# Altium PCB nrf52mini.PcbDoc
Units mm, origin at the board's own origin, x right, y up, seen from the top; angles counter-clockwise.
Board outline 69 x 66.5 mm, 2 copper layers (Top Layer, Bottom Layer), stack 0.97 mm thick; 12 components, 18 nets, 82 pads, 0 vias.
Unrouted connection lines stored in the file: 48.
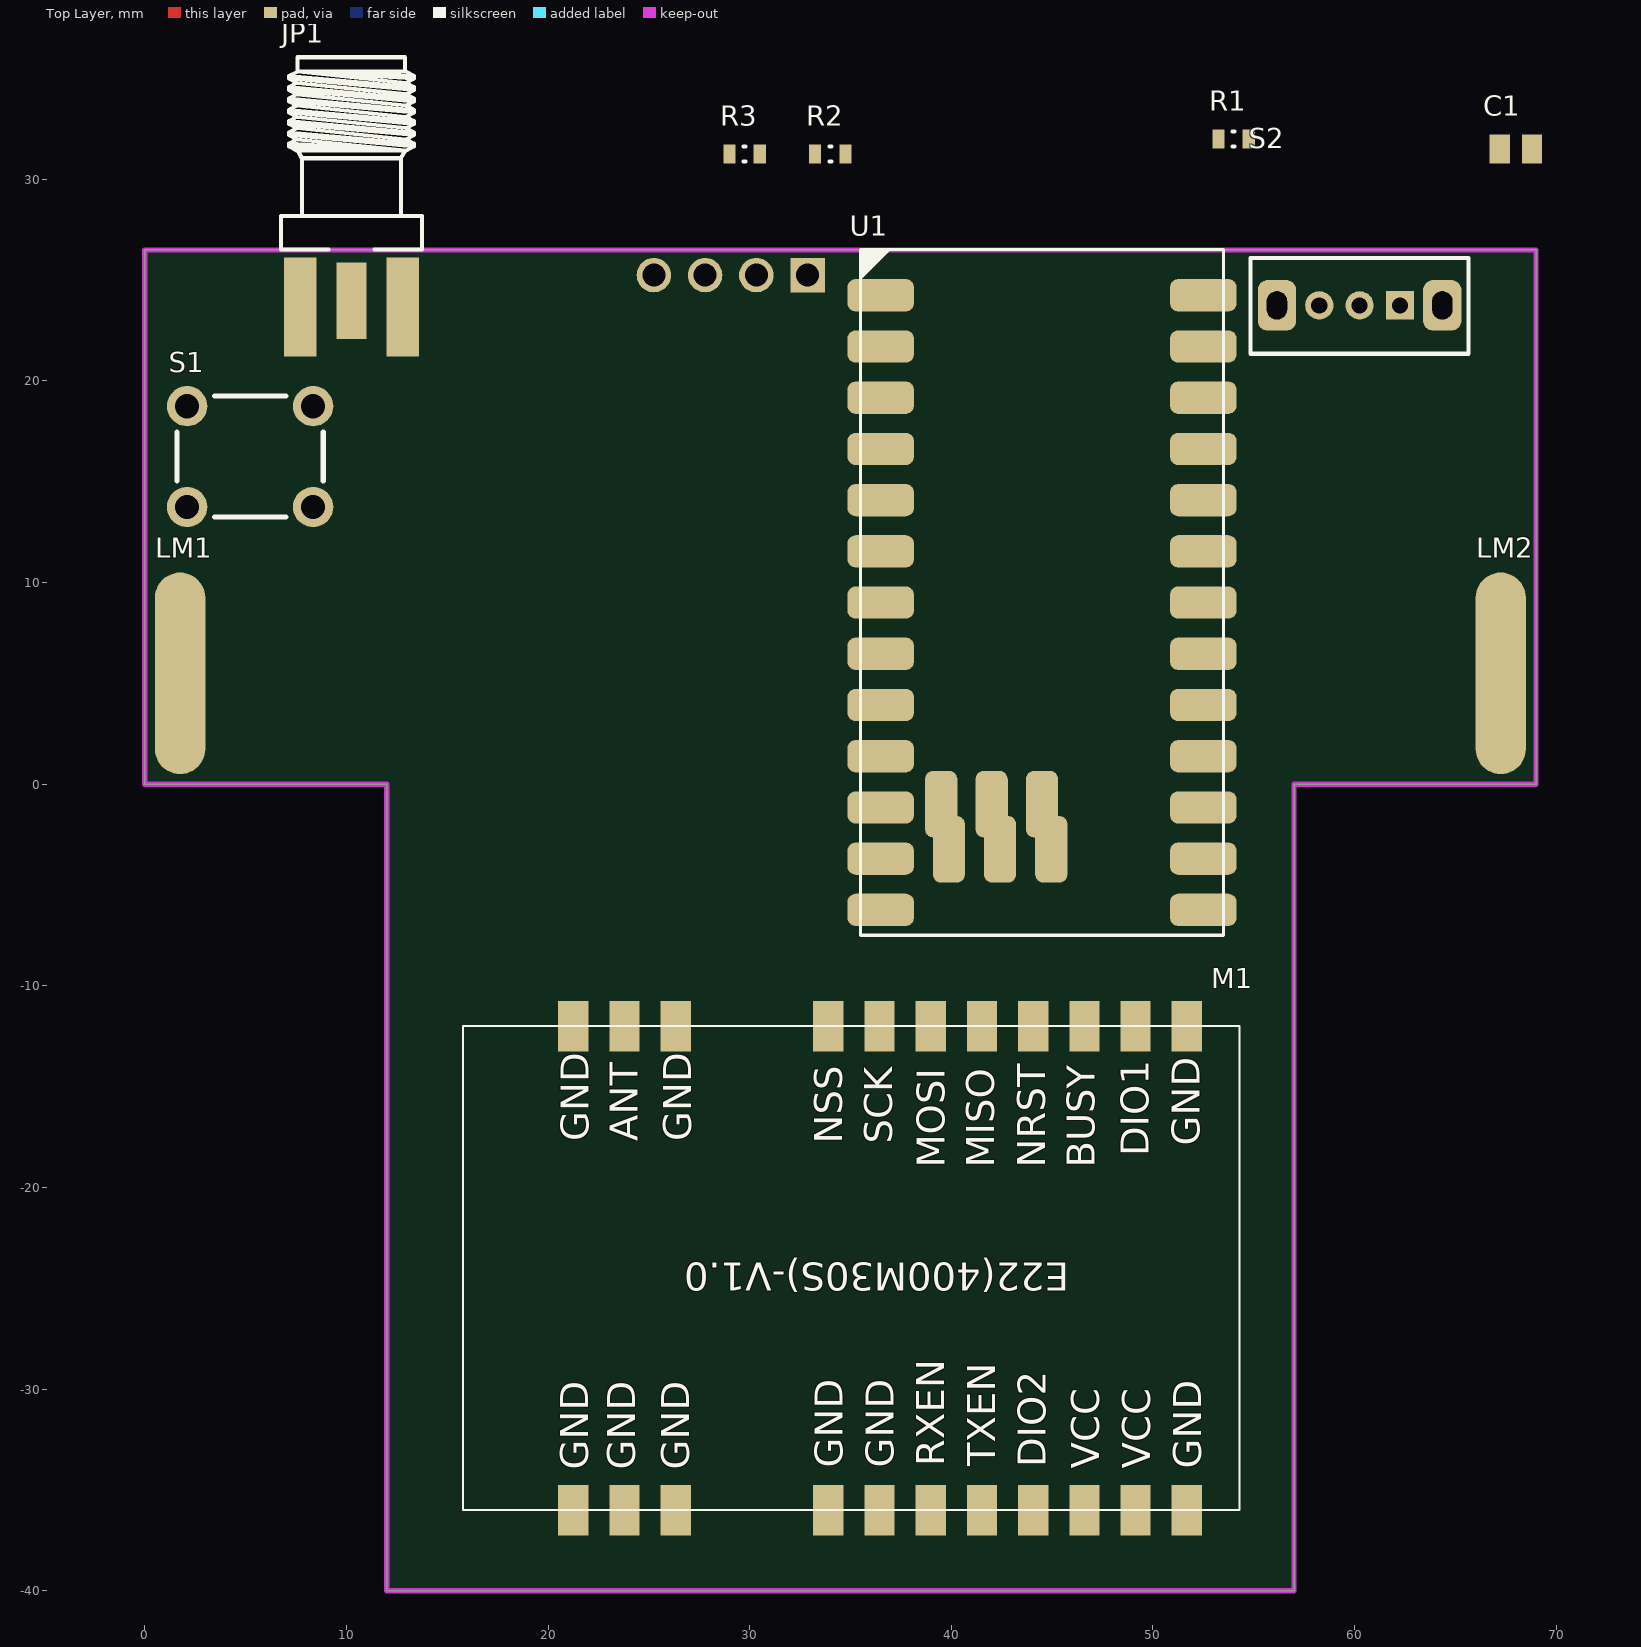
[diagram p0: Top Layer view]
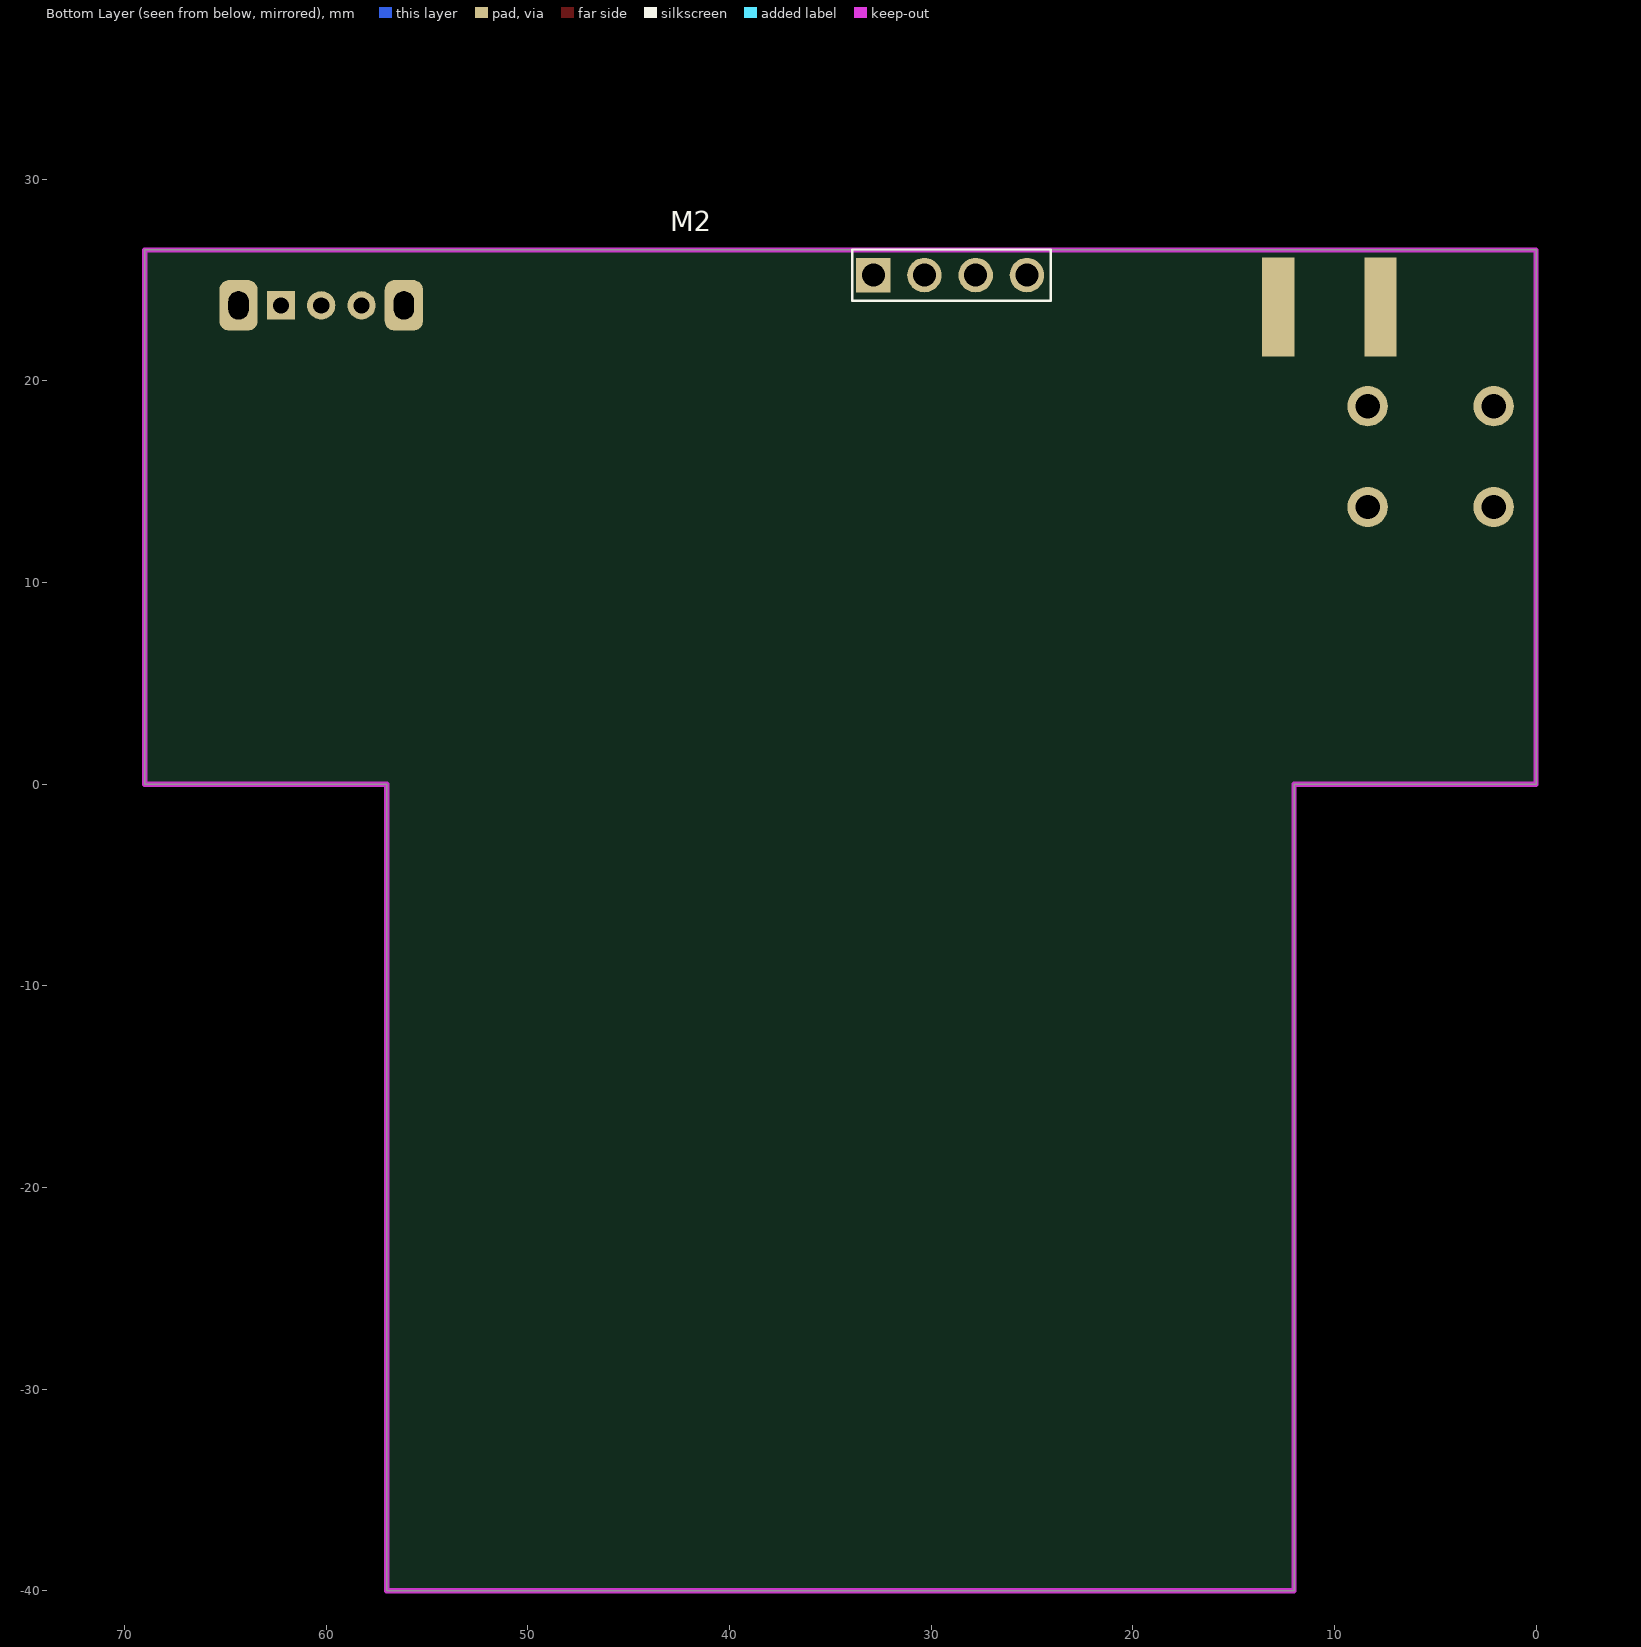
[diagram p1: Bottom Layer view, seen from below]

## Layer stack, top to bottom
Top Solder: solder mask 0.01, Solder Resist, Dk 3.5
Top Layer: signal copper 0.035
Dielectric 1: dielectric 0.9, FR-4, Dk 4.8
Bottom Layer: signal copper 0.035
Bottom Solder: solder mask 0.01, Solder Resist, Dk 3.5

## Board outline
0,0 12,0 12,-40 57,-40 57,0 69,0 69,26.5 0,26.5

## Design rules (kind name [scope] priority, off if disabled: settings)
Clearance [All] p1: gap=0.254 ignorepadtopadclearanceinfootprint=FALSE
PolygonConnect [All] p1: connectstyle=Relief reliefconductorwidth=0.254 reliefentries=4 polygonreliefangle="90 Angle" airgapwidth=0.254
RoutingVias [All] p1: holewidth=0.711 width=1.27 viastyle="Through Hole" minholewidth=0.711 minwidth=1.27 maxholewidth=0.711 maxwidth=1.27
SolderMaskExpansion [All] p1: expansion=0 istentingtop=FALSE
SupplyNets "Schematic Supply Nets_2" [InNet('GND')] p1: voltage=0.000
SupplyNets "Schematic Supply Nets_1" [InNet('+VBATT')] p2: voltage=0.000
SupplyNets "Schematic Supply Nets" [InNet('VCC')] p3: voltage=0.000
Width [All] p1: maxlimit=0.254 minlimit=0.254 preferedwidth=0.254
30 further rules are at their usual default settings.

## Components (designator, comment, footprint, x,y, rotation, side; value= is the part's Value field where it differs from the comment)
C1 "10uF" C-0805 68,31.5 r0 top
JP1 "EM-SA071-GGT" SMA_F_EDGE 10.25,25.25 r270 top
LM1 "LAMELY" LM2X10 1.75,5.5 r0 top
LM2 "LAMELY" LM2X10 67.25,5.5 r0 top
M1 "E22-400M30S" PE22(400M30S) 21.25,-36 r180 top
M2 "OLED0_96" OLED096_I2C 32.87,25.25 r180 bottom
R1 "10k" R-0603 54,32 r0 top
R2 "680k" R-0603 34,31.25 r0 top
R3 "1M" R-0603 29.75,31.25 r0 top
S1 "KLS7-TS3602 -3 15-180" BUTT_MIN 5.25,16.25 r0 top
S2 "SW SPDT" SK-12D07VG5 60.25,23.75 r180 top
U1 "NICENANO_V2" NICENANO_SMD 44.5,9.01 r0 top

## Footprints (in the part's own frame and the unit in brackets; to place one, negate y for a bottom-side part, rotate by r counter-clockwise, add the part's x,y. Pads: shape width x height; smd on the part's side, far side on the other; paste and mask are expansions set on the pad)
BUTT_MIN [mm]
  round 2 hole 1.2 mask+0.05: 1(-3.15,-2.5) 1(3.1,-2.5) 2(-3.15,2.5) 2(3.1,2.5)
  silkscreen extent -3.66,-3 3.6,3, body extent -3.95,-3.1 3.95,3.1, height 7.01
C-0805 [mm] "Chip Capacitor, 2-Leads, Body 2,00x1,25mm, IPC Medium Density"
  rect 1x1.45 smd: 1(-0.8,0) 2(0.8,0)
  body extent -1,-0.62 1,0.63, height 1.25
LM2X10 [mm]
  oval 2.5x10 smd mask+0.1: 1(0,0)
NICENANO_SMD [mm]
  rrect50% 3.3x1.6 smd: 1(-8,15.24) 2(-8,12.7) 3(-8,10.16) 4(-8,7.62) 5(-8,5.08) 6(-8,2.54) 7(-8,0) 8(-8,-2.54) 9(-8,-5.08) 10(-8,-7.62) 11(-8,-10.16) 12(-8,-12.7) 13(-8,-15.24) 14(8,-15.24) 15(8,-12.7) 16(8,-10.16) 17(8,-7.62) 18(8,-5.08) 19(8,-2.54) 20(8,0) 21(8,2.54) 22(8,5.08) 23(8,7.62) 24(8,10.16) 25(8,12.7) 26(8,15.24)
  rrect50% 1.6x3.3 smd: 27(-5,-10) 27(-4.62,-12.24) 28(-2.5,-10) 28(-2.08,-12.24) 29(0,-10) 29(0.46,-12.24)
  silkscreen extent -9,-16.5 9,17.5, body extent -8.9,-16.73 8.9,17.43, height 2.5
OLED096_I2C [mm] "Header, Vertical, 2.54 mm pitch; 0.70 mm lead width, 7 pins, 1 row, 7 pins per row, 16.51 mm L X 2.54 mm W X 7.54 mm H body"
  rect 1.71x1.71 hole 1.14 paste-2539.97: 1(0,0)
  round 1.71 hole 1.14 paste-2539.97: 2(2.54,0) 3(5.08,0) 4(7.62,0)
  silkscreen extent -1.04,-1.27 8.8,1.27, body extent -10.19,-26.7 17.81,1.3, height 7.08
PE22(400M30S) [mm] "38.5mm*24mm*3.8mm-S"
  rect 1.5x2.5 smd: 1(0,0) 2(-2.54,0) 3(-5.08,0) 4(-12.65,0) 5(-15.19,0) 6(-17.73,0) 7(-20.27,0) 8(-22.81,0) 9(-25.35,0) 10(-27.89,0) 11(-30.43,0) 12(-30.43,-24) 13(-27.89,-24) 14(-25.35,-24) 15(-22.81,-24) 16(-20.27,-24) 17(-17.73,-24) 18(-15.19,-24) 19(-12.65,-24) 20(-5.08,-24) 21(-2.54,-24) 22(0,-24)
  silkscreen extent -33.04,-24 5.46,0, body extent -32.81,-24.01 5.69,0.01, height 3.87
R-0603 [mm] "Chip Resistor, 2-Leads, Body 1,60x0,82mm, IPC Medium Density"
  rect 0.6x0.95 smd: 1(-0.75,0) 2(0.75,0)
  silkscreen extent -0.05,-0.38 0.05,0.38, body extent -0.8,-0.4 0.8,0.4, height 0.45
SK-12D07VG5 [mm]
  rect 1.4x1.4 hole 0.8: 1(-2,0)
  round 1.4 hole 0.8: 2(0,0) 3(2,0)
  rrect50% 1.9x2.5 hole 1 slot 1.4 at 90 deg: S1(-4.1,0) S1(4.1,0)
  silkscreen extent -5.4,-2.35 5.4,2.4, body extent -4.3,-7.05 4.3,2.3, height 4.75
SMA_F_EDGE [mm] "SMA End Launch Jack for 1.58mm PCB, 50 Ohm, Flat Tab Contact"
  rect 3.81x1.5 smd: 1(1.27,0)
  rect 4.9x1.6 smd: 2(1.575,2.54) 2(1.575,-2.54)
  rect 4.9x1.6 smd far side: 2(1.575,2.54) 2(1.575,-2.54)
  silkscreen extent -10.81,-3.5 -1.28,3.5, body extent -10.73,-3.25 2.77,3.25, height 3.7

## Part data
C1: library part CAPN, Voltage=50V, Вид=Конденсатор, Точність/група=NP0
JP1: library part SMA, "SMA Female R/A PCB Mount", Вид=Роз'єм
LM1 LM2: "Lamely", Вид=Роз'єм
M1: library part E22
M2: library part OLED0_96_I2C
R1 R2 R3: library part RES, Вид=Резистор, Точність/група=5%
S1: library part SW-1, Вид=Кнопка
S2: Вид=Перемикач
U1: Вид=Мікросхема

## Nets (pads, with @x,y where several pads share a name; then routed paths per layer and width w, separated by ;. In a path a pad name is that pad's centre, name@x,y a point inside that pad or via, vN(x,y) a via of type N, cw(c..) or ccw(c..) an arc to the next point about the centre after c; other vN are vias at no path point)
+VBATT: C1.1 M1.9 M1.10 R2.2 S2.2 U1.25 U1.26
AIN0_VBATT: R2.1 R3.2 U1.21
ANT_SW: M1.6 U1.6
BUSY: M1.14 U1.20
GND: C1.2 JP1.2 LM2.1 M1.1 M1.2 M1.3 M1.4 M1.5 M1.11 M1.12 M1.20 M1.22 M2.1 R3.1 S1.1 U1.1 U1.4 U1.5 U1.24
KEY: R1.2 S1.2 U1.10
MISO: M1.16 U1.19
MOSI: M1.17 U1.18
NetJP1_1: JP1.1 M1.21
NetLM1_1: LM1.1 S2.1
NSS: M1.19 U1.17
RF_IRQ: M1.13 U1.15
RF_RST: M1.15 U1.14
SCK: M1.18 U1.16
SCL: M2.3 U1.11
SDA: M2.4 U1.12
TXEN: M1.7 M1.8
VCC: M2.2 R1.1 U1.22
pads on no net: S2.3 S2.S1 U1.2 U1.3 U1.7 U1.8 U1.9 U1.13 U1.23 U1.27 U1.28 U1.29

## Keep-outs
Keep-Out Layer:
  the board outline again, w0.254

## Silkscreen, mask and mechanical layers (free items; w line width, h text height)
Mechanical 15:
  lines w0.254: 45,26.5 45,0 54,0 54,26.5

## Text inside footprints (layer, text, board x,y; h text height)
M1: Top Overlay "NSS" at 34.601,-17.83 h1.4 r90; Top Overlay "SCK" at 37.066,-17.83 h1.4 r90; Top Overlay "MOSI" at 39.666,-19.021 h1.4 r90; Top Overlay "MISO" at 42.131,-19.021 h1.4 r90; Top Overlay "NRST" at 44.656,-19.021 h1.4 r90; Top Overlay "BUSY" at 47.121,-19.021 h1.4 r90; Top Overlay "DIO1" at 49.782,-18.448 h1.4 r90; Top Overlay "GND" at 52.329,-17.936 h1.4 r90; Top Overlay "GND" at 27.094,-17.709 h1.4 r90; Top Overlay "ANT" at 24.452,-17.709 h1.4 r90; Top Overlay "GND" at 22.025,-17.709 h1.4 r90; Top Overlay "GND" at 21.998,-34.009 h1.4 r90; Top Overlay "GND" at 24.32,-34.009 h1.4 r90; Top Overlay "GND" at 26.993,-34.009 h1.4 r90; Top Overlay "GND" at 52.393,-33.949 h1.4 r90; Top Overlay "VCC" at 49.86,-33.949 h1.4 r90; Top Overlay "VCC" at 47.326,-33.949 h1.4 r90; Top Overlay "DIO2" at 44.688,-33.883 h1.4 r90; Top Overlay "TXEN" at 42.185,-33.831 h1.4 r90; Top Overlay "RXEN" at 39.652,-33.831 h1.4 r90; Top Overlay "GND" at 37.149,-33.904 h1.4 r90; Top Overlay "GND" at 34.616,-33.904 h1.4 r90; Top Overlay "E22(400M30S)-V1.0" at 45.849,-23.722 h1.4 r180